# Altium PCB SciencePCB5.pcbdoc
Units mil, origin at the board's own origin, x right, y up, seen from the top; angles counter-clockwise.
Board outline 3937.01 x 3858.27 mil, 2 copper layers (Top Layer, Bottom Layer); 11 components, 33 nets, 387 pads, 40 vias.
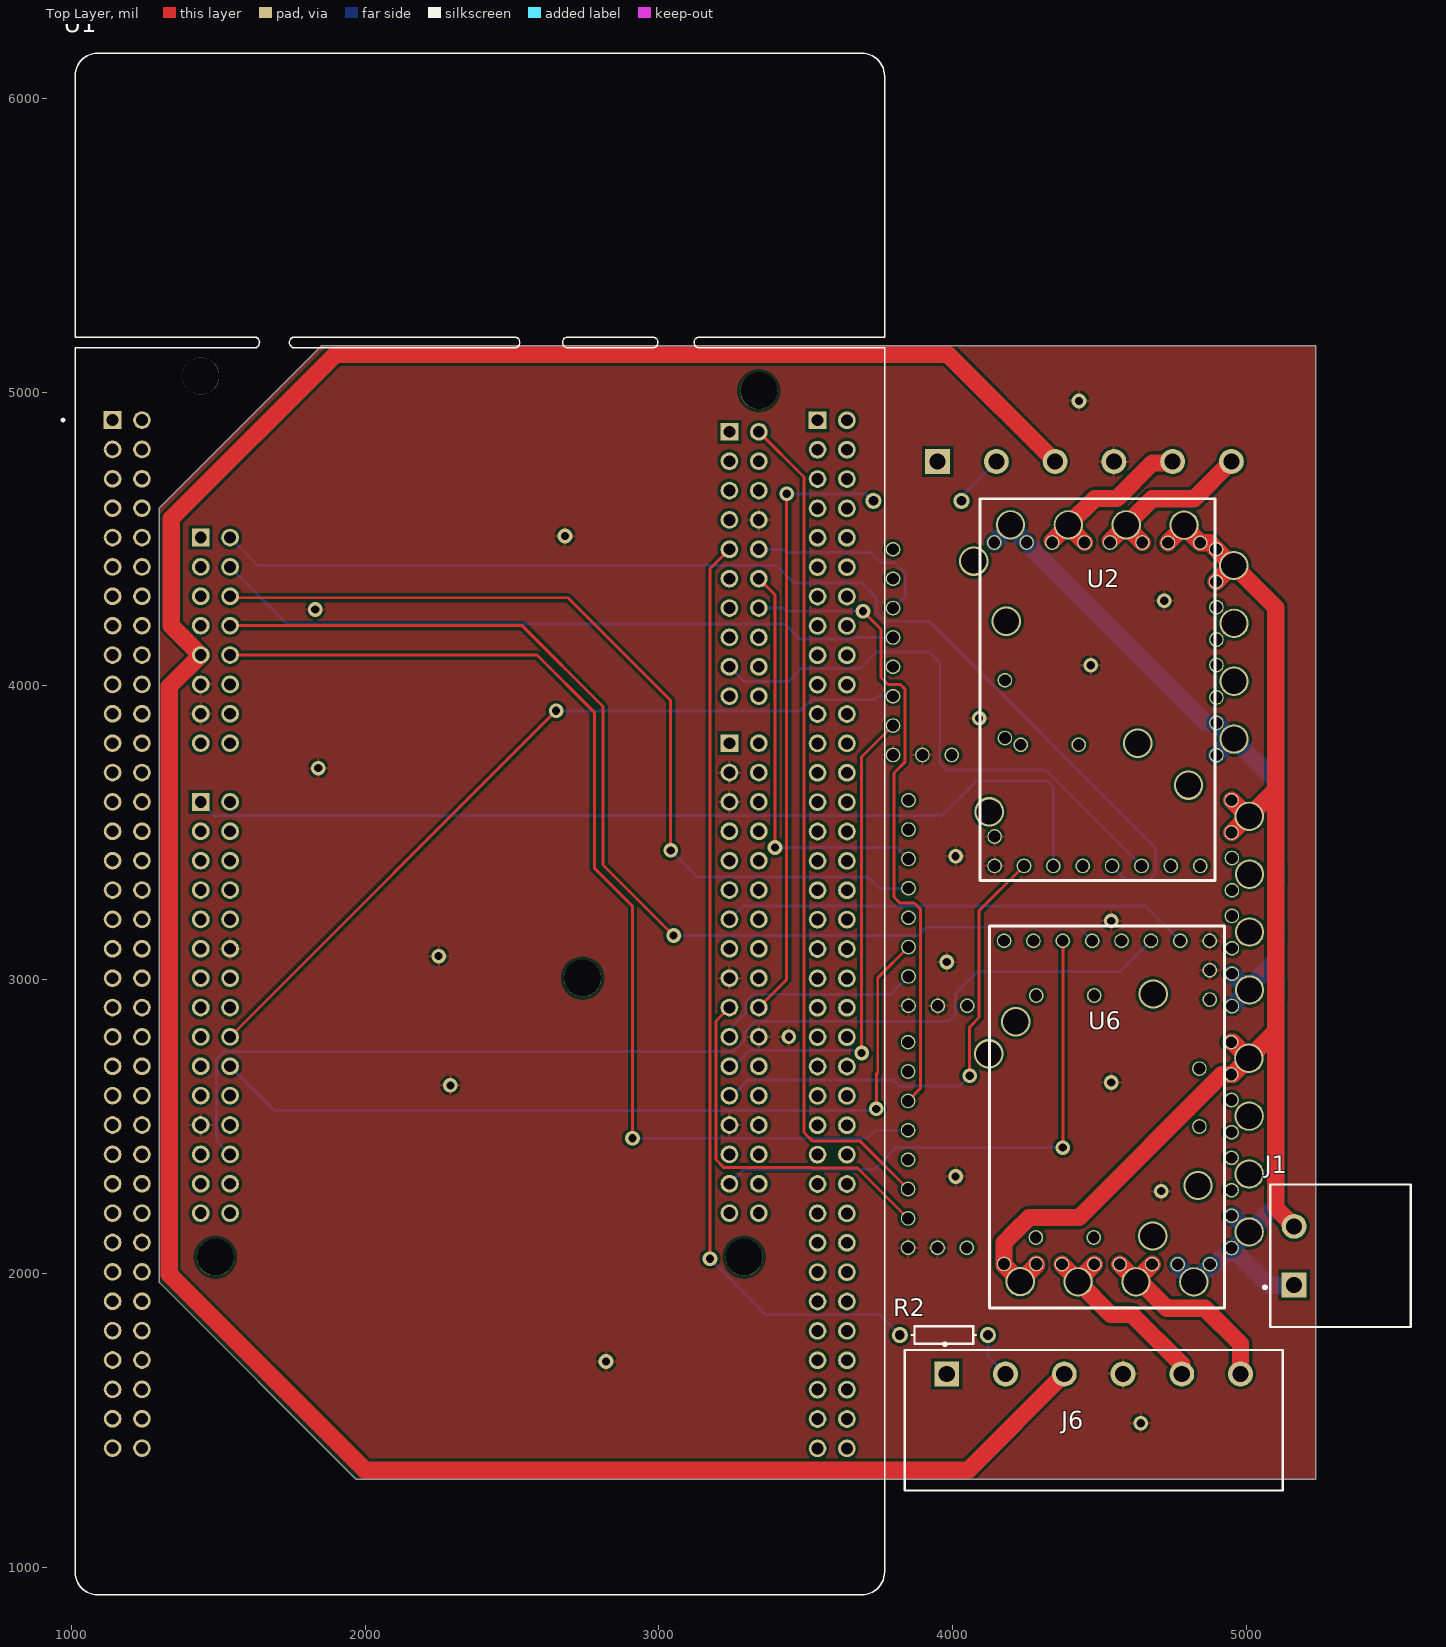
[diagram p0: Top Layer view]
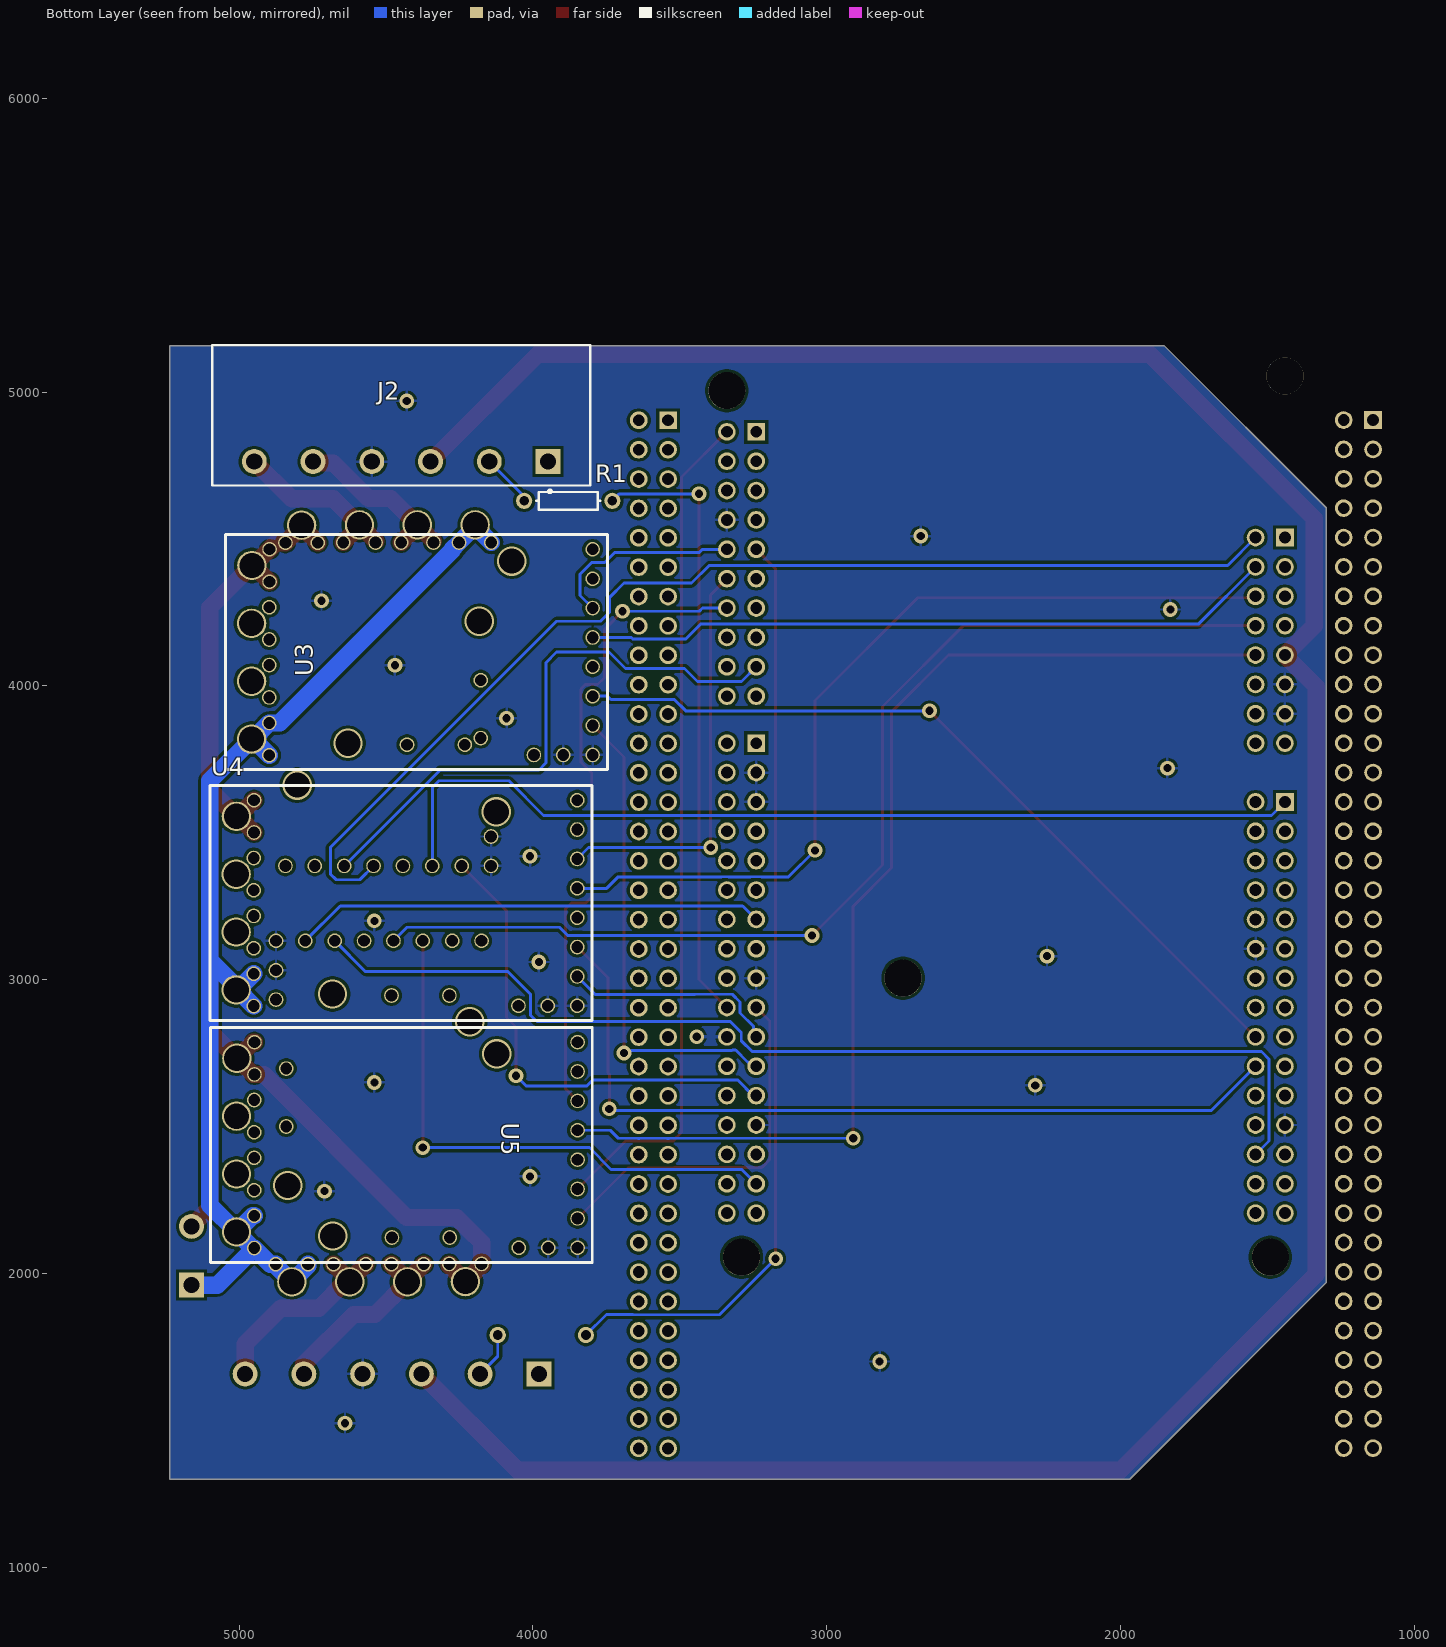
[diagram p1: Bottom Layer view, seen from below]
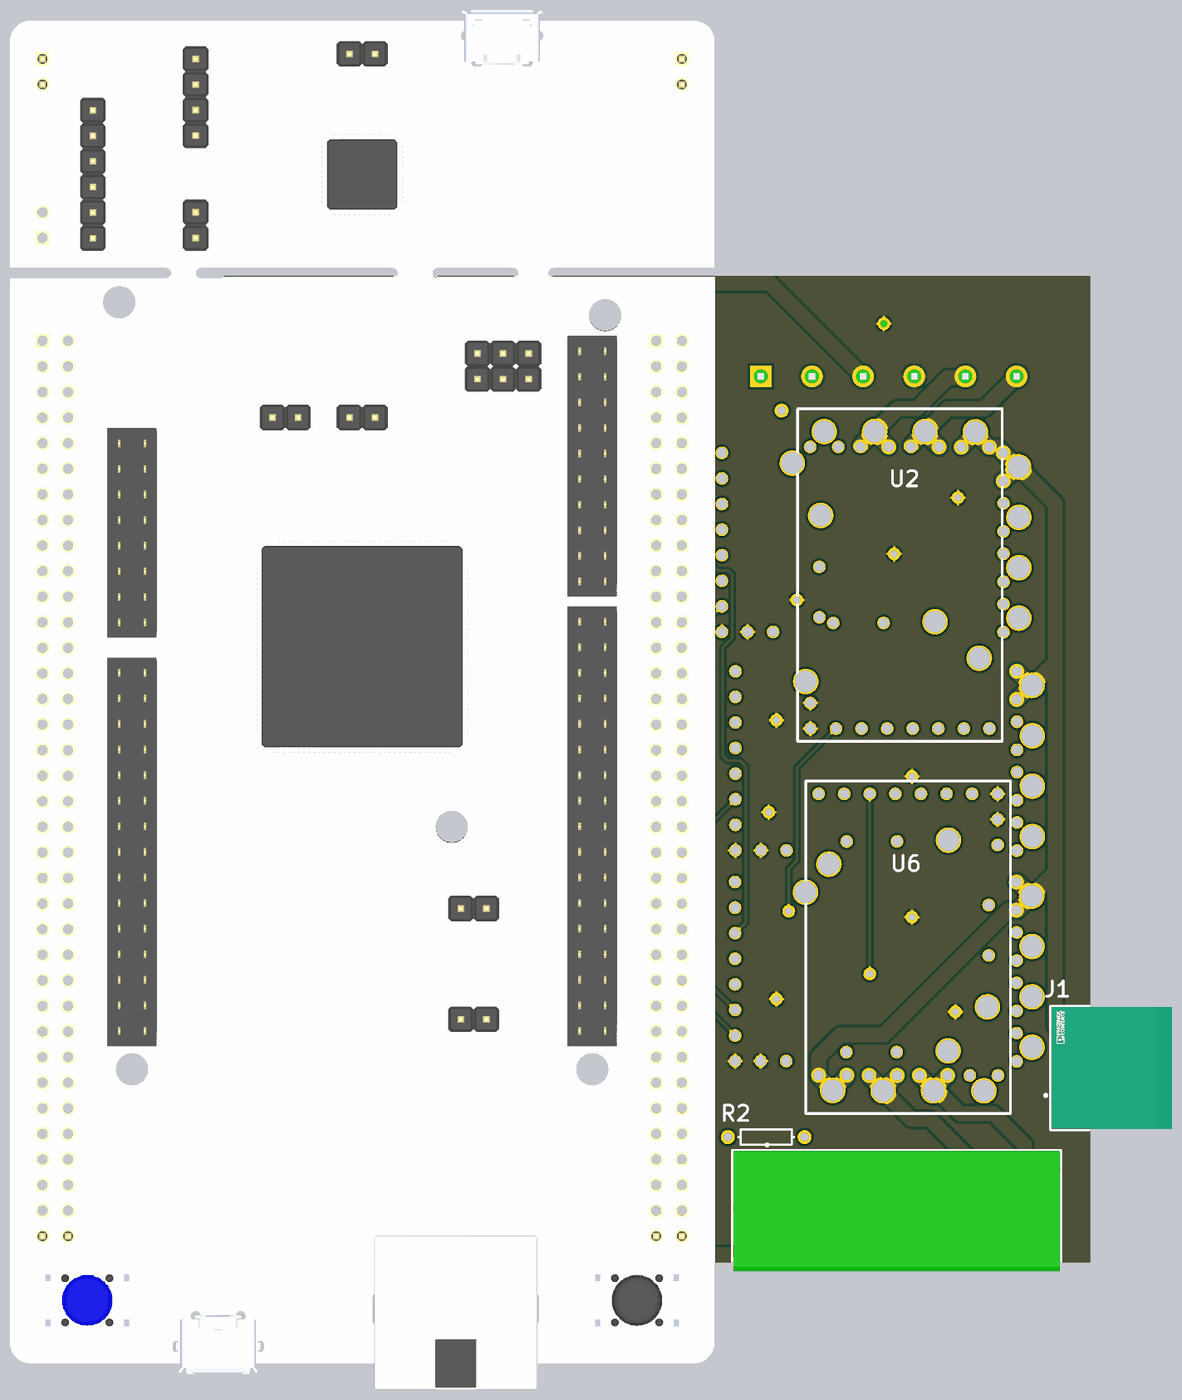
[diagram p2: 3D render of the assembled board from above, using the file's embedded part models]

## Layer stack, top to bottom
Top Solder: solder mask 0.4, Solder Resist, Dk 3.5
Top Layer: signal copper 1.4
Dielectric 1: dielectric 12.6, FR-4, Dk 4.8
Bottom Layer: signal copper 1.4
Bottom Solder: solder mask 0.4, Solder Resist, Dk 3.5

## Board outline
1968.5,1299.21 1299.21,1968.5 1299.21,4606.3 1850.39,5157.48 5236.22,5157.48 5236.22,1299.21

## Design rules (kind name [scope] priority, off if disabled: settings)
Clearance [InNetClass('All Nets')] p1: gap=10 ignorepadtopadclearanceinfootprint=FALSE except(0: Arc-Hole Track-Hole SMDPad-Hole THPad-Hole Via-Hole Fill-Hole Poly-Hole Region-Hole Text-Hole)
PolygonConnect [All] p1: connectstyle=Relief reliefconductorwidth=10 reliefentries=4 polygonreliefangle="90 Angle" airgapwidth=10
RoutingVias [All] p1: holewidth=28 width=50 viastyle="Through Hole" minholewidth=28 minwidth=50 maxholewidth=28 maxwidth=50
SolderMaskExpansion [All] p1: expansion=4 istentingtop=FALSE
Width Width_1 [InNetClass('logic')] p1: maxlimit=10 minlimit=10 preferedwidth=10
Width [InNetClass('power')] p2: maxlimit=59.06 minlimit=59.06 preferedwidth=59.06 minimp=50.000000 maximp=50.000000 favimp=50.000000
30 further rules are at their usual default settings.

## Classes and differential pairs
net class logic: NetJ2_2 NetJ6_2 NetR1_1 NetR2_1 NetU1_CN7_2 NetU1_CN7_10 NetU1_CN7_12 NetU1_CN7_14 NetU1_CN7_17 NetU1_CN8_2 NetU1_CN8_4 NetU1_CN8_6 NetU1_CN8_8 NetU1_CN8_10 NetU1_CN9_1 NetU1_CN9_18 NetU1_CN9_20 NetU1_CN9_26 NetU1_CN10_13 NetU1_CN10_19 NetU1_CN10_21 NetU1_CN10_23 NetU1_CN10_25 NetU1_CN10_31
net class power: +5 +24 GND_M NetJ2_5 NetJ2_6 NetJ6_5 NetJ6_6
component class STM32: U1
component class SCIENCE: J1 J2 J6 R1 R2 U2 U3 U4 U5 U6

## Components (designator, comment, footprint, x,y, rotation, side; value= is the part's Value field where it differs from the comment)
J1 "1757242" FP-1757242-MFG 5320,2060 r90 top
J2 "1757284" FP-1757284-MFG 4448.82,4921.26 r0 bottom
J6 "1757284" FP-1757284-MFG 4480,1500 r0 top
R1 "Res1" AXIAL-0.3 3880,4630 r0 bottom value=320
R2 "Res1" AXIAL-0.3 3970,1790 r0 top value=320
U1 "NUCLEO-F429ZI" MODULE_NUCLEO-F429ZI 2390,3529.8 r0 top
U2 "Pololu G2 High-Power Motor Driver 24v21" "Pololu G2 High-Power Motor Driver 24v21" 4892.82,4637.19 r180 top
U3 "Pololu G2 High-Power Motor Driver 24v21" "Pololu G2 High-Power Motor Driver 24v21" 5046.91,4514.86 r270 bottom
U4 "Pololu G2 High-Power Motor Driver 24v21" "Pololu G2 High-Power Motor Driver 24v21" 5099.63,3660.94 r270 bottom
U5 "Pololu G2 High-Power Motor Driver 24v21" "Pololu G2 High-Power Motor Driver 24v21" 5098.27,2837.17 r270 bottom
U6 "Pololu G2 High-Power Motor Driver 24v21" "Pololu G2 High-Power Motor Driver 24v21" 4125,1882 r0 top

## Footprints (in the part's own frame and the unit in brackets; to place one, negate y for a bottom-side part, rotate by r counter-clockwise, add the part's x,y. Pads: shape width x height; smd on the part's side, far side on the other; paste and mask are expansions set on the pad)
AXIAL-0.3 [mm] "Axial Device, Thru-Hole; 2 Leads; 0.3 in Pin Spacing"
  round 1.4 hole 0.85: 1(-3.81,0) 2(3.81,0)
  silkscreen extent -2.77,-0.76 2.77,0.76
FP-1757242-MFG [mm]
  rect 2.15x2.15 hole 1.4 paste-1000 mask+0: 1(-2.54,4)
  round 2.15 hole 1.4 paste-1000 mask+0: 2(2.54,4)
  silkscreen extent -6.15,-6.07 6.15,6.65, body extent -6.04,-6 6.04,6, height 8.75
FP-1757284-MFG [mm]
  rect 2.15x2.15 hole 1.4 paste-1000 mask+0: 1(-12.7,4)
  round 2.15 hole 1.4 paste-1000 mask+0: 2(-7.62,4) 3(-2.54,4) 4(2.54,4) 5(7.62,4) 6(12.7,4)
  silkscreen extent -16.34,-6.08 16.34,6.7, body extent -16.2,-6 16.2,6, height 8.61
MODULE_NUCLEO-F429ZI [mm]
  rect 1.53x1.53 / inner round 1.53 / far side rect 1.53x1.53 hole 1.02: CN7_1(21.59,33.914) CN8_1(-24.13,24.77) CN9_1(-24.13,1.91) CN10_1(21.59,6.99) CN11_1(-31.75,34.93) CN12_1(29.21,34.91)
  round 1.53 hole 1.02: CN7_2(24.13,33.914) CN7_3(21.59,31.374) CN7_4(24.13,31.374) CN7_5(21.59,28.834) CN7_6(24.13,28.834) CN7_7(21.59,26.294) CN7_8(24.13,26.294) CN7_9(21.59,23.754) CN7_10(24.13,23.754) CN7_11(21.59,21.214) CN7_12(24.13,21.214) CN7_13(21.59,18.674) CN7_14(24.13,18.674) CN7_15(21.59,16.134) CN7_16(24.13,16.134) CN7_17(21.59,13.594) CN7_18(24.13,13.594) CN7_19(21.59,11.054) CN7_20(24.13,11.054) CN8_2(-21.59,24.77) CN8_3(-24.13,22.23) CN8_4(-21.59,22.23) CN8_5(-24.13,19.69) CN8_6(-21.59,19.69) CN8_7(-24.13,17.15) CN8_8(-21.59,17.15) CN8_9(-24.13,14.61) CN8_10(-21.59,14.61) CN8_11(-24.13,12.07) CN8_12(-21.59,12.07) CN8_13(-24.13,9.53) CN8_14(-21.59,9.53) CN8_15(-24.13,6.99) CN8_16(-21.59,6.99) CN9_2(-21.59,1.91) CN9_3(-24.13,-0.63) CN9_4(-21.59,-0.63) CN9_5(-24.13,-3.17) CN9_6(-21.59,-3.17) CN9_7(-24.13,-5.71) CN9_8(-21.59,-5.71) CN9_9(-24.13,-8.25) CN9_10(-21.59,-8.25) CN9_11(-24.13,-10.79) CN9_12(-21.59,-10.79) CN9_13(-24.13,-13.33) CN9_14(-21.59,-13.33) CN9_15(-24.13,-15.87) CN9_16(-21.59,-15.87) CN9_17(-24.13,-18.41) CN9_18(-21.59,-18.41) CN9_19(-24.13,-20.95) CN9_20(-21.59,-20.95) CN9_21(-24.13,-23.49) CN9_22(-21.59,-23.49) CN9_23(-24.13,-26.03) CN9_24(-21.59,-26.03) CN9_25(-24.13,-28.57) CN9_26(-21.59,-28.57) CN9_27(-24.13,-31.11) CN9_28(-21.59,-31.11) CN9_29(-24.13,-33.65) CN9_30(-21.59,-33.65) CN10_2(24.13,6.99) CN10_3(21.59,4.45) CN10_4(24.13,4.45) CN10_5(21.59,1.91) CN10_6(24.13,1.91) CN10_7(21.59,-0.63) CN10_8(24.13,-0.63) CN10_9(21.59,-3.17) CN10_10(24.13,-3.17) CN10_11(21.59,-5.71) CN10_12(24.13,-5.71) CN10_13(21.59,-8.25) CN10_14(24.13,-8.25) CN10_15(21.59,-10.79) CN10_16(24.13,-10.79) CN10_17(21.59,-13.33) CN10_18(24.13,-13.33) CN10_19(21.59,-15.87) CN10_20(24.13,-15.87) CN10_21(21.59,-18.41) CN10_22(24.13,-18.41) CN10_23(21.59,-20.95) CN10_24(24.13,-20.95) CN10_25(21.59,-23.49) CN10_26(24.13,-23.49) CN10_27(21.59,-26.03) CN10_28(24.13,-26.03) CN10_29(21.59,-28.57) CN10_30(24.13,-28.57) CN10_31(21.59,-31.11) CN10_32(24.13,-31.11) CN10_33(21.59,-33.65) CN10_34(24.13,-33.65) CN11_2(-29.21,34.93) CN11_3(-31.75,32.39) CN11_4(-29.21,32.39) CN11_5(-31.75,29.85) CN11_6(-29.21,29.85) CN11_7(-31.75,27.31) CN11_8(-29.21,27.31) CN11_9(-31.75,24.77) CN11_10(-29.21,24.77) CN11_11(-31.75,22.23) CN11_12(-29.21,22.23) CN11_13(-31.75,19.69) CN11_14(-29.21,19.69) CN11_15(-31.75,17.15) CN11_16(-29.21,17.15) CN11_17(-31.75,14.61) CN11_18(-29.21,14.61) CN11_19(-31.75,12.07) CN11_20(-29.21,12.07) CN11_21(-31.75,9.53) CN11_22(-29.21,9.53) CN11_23(-31.75,6.99) CN11_24(-29.21,6.99) CN11_25(-31.75,4.45) CN11_26(-29.21,4.45) CN11_27(-31.75,1.91) CN11_28(-29.21,1.91) CN11_29(-31.75,-0.63) CN11_30(-29.21,-0.63) CN11_31(-31.75,-3.17) CN11_32(-29.21,-3.17) CN11_33(-31.75,-5.71) CN11_34(-29.21,-5.71) CN11_35(-31.75,-8.25) CN11_36(-29.21,-8.25) CN11_37(-31.75,-10.79) CN11_38(-29.21,-10.79) CN11_39(-31.75,-13.33) CN11_40(-29.21,-13.33) CN11_41(-31.75,-15.87) CN11_42(-29.21,-15.87) CN11_43(-31.75,-18.41) CN11_44(-29.21,-18.41) CN11_45(-31.75,-20.95) CN11_46(-29.21,-20.95) CN11_47(-31.75,-23.49) CN11_48(-29.21,-23.49) CN11_49(-31.75,-26.03) CN11_50(-29.21,-26.03) CN11_51(-31.75,-28.57) CN11_52(-29.21,-28.57) CN11_53(-31.75,-31.11) CN11_54(-29.21,-31.11) CN11_55(-31.75,-33.65) CN11_56(-29.21,-33.65) CN11_57(-31.75,-36.19) CN11_58(-29.21,-36.19) CN11_59(-31.75,-38.73) CN11_60(-29.21,-38.73) CN11_61(-31.75,-41.27) CN11_62(-29.21,-41.27) CN11_63(-31.75,-43.81) CN11_64(-29.21,-43.81) CN11_65(-31.75,-46.35) CN11_66(-29.21,-46.35) CN11_67(-31.75,-48.89) CN11_68(-29.21,-48.89) CN11_69(-31.75,-51.43) CN11_70(-29.21,-51.43) CN11_71(-31.75,-53.97) CN11_72(-29.21,-53.97) CN12_2(31.75,34.91) CN12_3(29.21,32.37) CN12_4(31.75,32.37) CN12_5(29.21,29.83) CN12_6(31.75,29.83) CN12_7(29.21,27.29) CN12_8(31.75,27.29) CN12_9(29.21,24.75) CN12_10(31.75,24.75) CN12_11(29.21,22.21) CN12_12(31.75,22.21) CN12_13(29.21,19.67) CN12_14(31.75,19.67) CN12_15(29.21,17.13) CN12_16(31.75,17.13) CN12_17(29.21,14.59) CN12_18(31.75,14.59) CN12_19(29.21,12.05) CN12_20(31.75,12.05) CN12_21(29.21,9.51) CN12_22(31.75,9.51) CN12_23(29.21,6.97) CN12_24(31.75,6.97) CN12_25(29.21,4.43) CN12_26(31.75,4.43) CN12_27(29.21,1.89) CN12_28(31.75,1.89) CN12_29(29.21,-0.65) CN12_30(31.75,-0.65) CN12_31(29.21,-3.19) CN12_32(31.75,-3.19) CN12_33(29.21,-5.73) CN12_34(31.75,-5.73) CN12_35(29.21,-8.27) CN12_36(31.75,-8.27) CN12_37(29.21,-10.81) CN12_38(31.75,-10.81) CN12_39(29.21,-13.35) CN12_40(31.75,-13.35) CN12_41(29.21,-15.89) CN12_42(31.75,-15.89) CN12_43(29.21,-18.43) CN12_44(31.75,-18.43) CN12_45(29.21,-20.97) CN12_46(31.75,-20.97) CN12_47(29.21,-23.51) CN12_48(31.75,-23.51) CN12_49(29.21,-26.05) CN12_50(31.75,-26.05) CN12_51(29.21,-28.59) CN12_52(31.75,-28.59) CN12_53(29.21,-31.13) CN12_54(31.75,-31.13) CN12_55(29.21,-33.67) CN12_56(31.75,-33.67) CN12_57(29.21,-36.21) CN12_58(31.75,-36.21) CN12_59(29.21,-38.75) CN12_60(31.75,-38.75) CN12_61(29.21,-41.29) CN12_62(31.75,-41.29) CN12_63(29.21,-43.83) CN12_64(31.75,-43.83) CN12_65(29.21,-46.37) CN12_66(31.75,-46.37) CN12_67(29.21,-48.91) CN12_68(31.75,-48.91) CN12_69(29.21,-51.45) CN12_70(31.75,-51.45) CN12_71(29.21,-53.99) CN12_72(31.75,-53.99)
  round 3.2 hole 3.2 unplated: ""(-24.13,38.74) ""(-22.86,-37.46) ""(8.89,-13.33) ""(22.86,-37.46) ""(24.13,37.47)
  silkscreen extent -36.14,-66.67 35,66.67, body extent -35,-69.27 35,67.72, height 12.28
"Pololu G2 High-Power Motor Driver 24v21" [mil]
  round 50 hole 40: 1(50,1250) 2(150,1250) 3(250,1250) 4(350,1250) 5(450,1250) 6(550,1250) 7(650,1250) 8(750,1150) 8(750,1250) 9(750,1050) 10(715,815) 11(715,618) 12(641,149) 12(751,149) 13(444,149) 13(554,149) 14(247,149) 14(357,149) 15(50,150) 15(160,150)
  round 100 hole 86: 12(696,89) 13(499,89) 14(302,89) 15(105,90)
  silkscreen extent 0,0 800,1300

## Part data
J1: library part CMP-09399-000010-1, "TERM BLOCK HDR 2POS 90DEG 5.08MM", Color=Grey, Current=15A, Current Rating=12A, Flammability Rating="UL94 V-0", Housing Color=Green, Package Quantity=50, Voltage=300V, Voltage Rating=250V, Voltage Rating (DC)=320V, Approvals=UL, Connector Type=Plug, Contact Material=Tin, Contact Plating=Tin, Depth=12mm, Gender=Male, Height=12.08mm, Housing Material=PBT, Lead Free="Lead Free", Length=12.16mm, Max Current Rating=12A, Mount="Through Hole", Number of Contacts=2, Number of Levels=1, Number of Poles=2, Number of Positions=2, Number of Positions Per Level=2, Number of Rows=1, Orientation="Right Angle", Packaging=Bulk, Pitch=5.08mm, REACH SVHC="No SVHC", RoHS Compliant=Yes, Series=MSTBA, Termination=Solder, Weight=5.396916oz, Width=12.1mm
J2 J6: library part CMP-09399-000007-1, "TERM BLOCK HDR 6POS 90DEG 5.08MM", Color=Grey, Current=15A, Current Rating=12A, Flammability Rating="UL94 V-0", Housing Color=Green, Package Quantity=50, Voltage=300V, Voltage Rating=250V, Voltage Rating (DC)=320V, Approvals=UL, Connector Type=Plug, Contact Material=Tin, Contact Plating=Tin, Depth=12mm, Gender=Male, Height=12.1mm, Housing Material=Polybutylene, Lead Free="Lead Free", Length=32.48mm, Max Current Rating=12A, Mount="Through Hole", Number of Contacts=6, Number of Levels=1, Number of Poles=6, Number of Positions=6, Number of Positions Per Level=6, Number of Rows=1, Orientation="Right Angle", Packaging=Bulk, Pitch=5.08mm, REACH SVHC="No SVHC", RoHS Compliant=Yes, Series=MSTBA, Termination=Solder, Weight=5.396916oz, Width=32.4mm
R1 R2: "Resistor", LatestRevisionDate=17-Jul-2002, LatestRevisionNote="Re-released for DXP Platform.", PackageDescription="Axial Device, Thru-Hole; 2 Leads; 0.3 in Pin Spacing", PackageReference=AXIAL-0.3, Published=8-Jun-2000, Publisher="Altium Limited"
U1: "STM32F429ZI, mbed-Enabled Development Nucleo-144 STM32F4 ARMÂ® CortexÂ®-M4 MCU 32-Bit Embedded Evaluation Board", Package=None, Availability="In Stock", Check_prices=https://www.snapeda.com/parts/NUCLEO-F429ZI/STMicroelectronics/view-part/?ref=eda, MF=STMicroelectronics, MP=NUCLEO-F429ZI, Price=None, Purchase-URL=https://pricing.snapeda.com/search/part/NUCLEO-F429ZI/?ref=eda, SnapEDA_Link=https://www.snapeda.com/parts/NUCLEO-F429ZI/STMicroelectronics/view-part/?ref=snap

## Via types
v1: diameter 50, hole 28, Top Layer to Bottom Layer, 30 vias
v2: diameter 100, hole 86, Top Layer to Bottom Layer, 10 vias

## Nets (pads, with @x,y where several pads share a name; then routed paths per layer and width w, separated by ;. In a path a pad name is that pad's centre, name@x,y a point inside that pad or via, vN(x,y) a via of type N, cw(c..) or ccw(c..) an arc to the next point about the centre after c; other vN are vias at no path point)
+3.3: U1.CN8_7
+5: J2.3 J6.3 U1.CN8_9 | length 9508.5
  Top Layer w59.06: J2.3 3984.6,5128 1898,5128 1340,4570 1340,4205 U1.CN8_9 1333,3998 1333,1997 2000,1330 4052.52,1330 J6.3
+24: J1.2 U2.15 U3.15 U4.15 U5.15 U6.15 | length 4552.5
  Top Layer w59.06: U6.15@4285,2032 4285,2027 4230,1972 4175,2027 4175,2032 4175,2105 4218.74,2148.74 4218.74,2148.89 4259.85,2190 4302.38,2190 4387.46,2190 4430,2190 4917.17,2677.17 4948.27,2677.17 4953.27,2677.17 U5.15@5008.27,2732.17 ; U2.15@4732.82,4487.19 U2.15@4787.82,4542.19 ; U2.15@4787.82,4547.19 U2.15@4787.82,4542.19 ; U3.15@4896.91,4354.86 U3.15@4951.91,4409.86 ; U5.15@4948.27,2787.17 4953.27,2787.17 U5.15@5008.27,2732.17 ; U4.15@4949.63,3500.94 U4.15@5004.63,3555.94 ; U4.15@4949.63,3610.94 U4.15@5004.63,3555.94 ; J1.2 5100,2222.52 5100,2823.9 ; U2.15@4787.82,4542.19 4842.82,4487.19 4874.58,4487.19 4896.91,4464.86 U3.15@4951.91,4409.86 ; U3.15@4951.91,4409.86 4956.91,4409.86 5100,4266.77 5100,3646.31 ; U4.15@5004.63,3555.94 5009.63,3555.94 5100,3646.31 ; U5.15@5008.27,2732.17 5100,2823.9 ; 5100,2823.9 5100,2927.7 5100.16,2927.85 5100.16,3002.02 5100,3002.18 5100,3124.7 5100.16,3124.85 5100.16,3199.02 5100,3199.18 5100,3321.7 5100.16,3321.85 5100.16,3396.02 5100,3396.18 5100,3646.31
GND: J2.4 J6.4 U1.CN7_8 U1.CN8_11 U1.CN8_13 U1.CN9_12 U1.CN9_23 U1.CN10_3 U1.CN10_5 U1.CN10_17 U1.CN10_22 U1.CN10_27 U2.8 U3.8 U4.8 U5.8 U6.8
  other v1: 4640,1490 2820,1700 4710,2280 4010,2330 2290,2640 4540,2650 3442.42,2805.87 3980,3060 2250,3080 4540,3200 4010,3420 1840,3720 4090,3890 4470,4070 1830,4260 4720,4290 2680,4510 4430,4970
GND_M: J1.1 U2.12 U3.12 U4.12 U5.12 U6.12 | length 3989.4
  Bottom Layer w59.06: U2.12@4141.82,4488.19 U2.12@4196.82,4543.19 ; U2.12@4196.82,4548.19 U2.12@4196.82,4543.19 ; U6.12@4766,2031 4766,2026 4821,1971 4876,2026 4876,2031 4894.1,2031 U5.12@4949.27,2086.17 ; U3.12@4897.91,3763.86 U3.12@4952.91,3818.86 ; U5.12@4949.27,2196.17 4954.27,2196.17 U5.12@5009.27,2141.17 ; U4.12@4950.63,2909.94 U4.12@5005.63,2964.94 ; U4.12@4950.63,3019.94 U4.12@5005.63,2964.94 ; J1.1 5075.43,1960 U5.12@4949.27,2086.17 ; U2.12@4196.82,4543.19 4251.82,4488.19 4274.29,4465.72 4274.29,4461.46 4861.89,3873.86 4897.91,3873.86 U3.12@4952.91,3818.86 ; U5.12@4949.27,2086.17 4954.27,2086.17 U5.12@5009.27,2141.17 ; U3.12@4952.91,3818.86 4957.91,3818.86 5100.16,3676.61 5100.16,3065.54 ; U4.12@5005.63,2964.94 5010.63,2964.94 5010.63,2976.02 5100.16,3065.54 ; U5.12@5009.27,2141.17 5100.16,2232.06 5100.16,3065.54
NetJ2_2: J2.2 R1.2 | length 183
  Bottom Layer w10: R1.2 4030,4644.96 J2.2
NetJ2_5: J2.5 U2.13 | length 609.9
  Top Layer w10: U2.13@4338.82,4488.19 U2.13@4338.82,4493.19 ; U2.13@4393.82,4543.19 U2.13@4393.82,4548.19
  Top Layer w59.06: U2.13@4338.82,4493.19 4393.82,4548.19 4483.35,4637.72 4558.98,4637.72 4680.14,4758.88 4743.92,4758.88 J2.5 ; U2.13@4393.82,4543.19 U2.13@4448.82,4488.19
NetJ2_6: J2.6 U2.14 | length 612.9
  Top Layer w10: U2.14@4535.82,4488.19 U2.14@4535.82,4493.19 ; U2.14@4590.82,4543.19 U2.14@4590.82,4548.19
  Top Layer w59.06: U2.14@4535.82,4493.19 4590.82,4548.19 4679.35,4636.72 4821.76,4636.72 J2.6 ; U2.14@4590.82,4543.19 U2.14@4645.82,4488.19
NetJ6_2: J6.2 R2.2 | length 157.4
  Bottom Layer w10: R2.2 4120,1717.48 J6.2
NetJ6_5: J6.5 U6.14 | length 662.5
  Top Layer w10: U6.14@4427,1971 U6.14@4427,1976
  Top Layer w59.06: U6.14@4372,2031 4427,1976 U6.14@4482,2031 ; U6.14@4427,1971 4538,1860 4610,1860 4780,1690 J6.5
NetJ6_6: J6.6 U6.13 | length 706.5
  Top Layer w10: U6.13@4624,1971 U6.13@4624,1976
  Top Layer w59.06: U6.13@4569,2031 4624,1976 U6.13@4679,2031 ; U6.13@4624,1971 4639,1971 4728.53,1881.47 4858.53,1881.47 4980,1760 J6.6
NetR1_1: R1.1 U1.CN10_20 | length 2093.3
  Top Layer w10: U1.CN10_20 3435,3000 v1(3435,4654)
  Bottom Layer w10: v1(3435,4654) 3706,4654 R1.1
NetR2_1: R2.1 U1.CN7_9 | length 3196.8
  Top Layer w10: v1(3174,2050) 3174,4399 U1.CN7_9
  Bottom Layer w10: v1(3174,2050) 3364.91,1859.09 3658.69,1859.09 3659.59,1860 3750,1860 R2.1
NetU1_CN7_2: U1.CN7_2 U5.6 | length 2882.9
  Top Layer w10: U1.CN7_2 3494,4711 3494,2480 3524,2450 3685.43,2450 U5.6
NetU1_CN7_10: U1.CN7_10 U3.3 | length 668.2
  Bottom Layer w10: U1.CN7_10 3423,4465 3434,4454 3722,4454 3756,4420 3800,4420 3840,4380 3840,4307.95 U3.3
NetU1_CN7_12: U1.CN7_12 U4.3 | length 1408.6
  Top Layer w10: U1.CN7_12 3395,4310 v1(3395,3450)
  Bottom Layer w10: v1(3395,3450) 3810.57,3450 U4.3
NetU1_CN7_14: U1.CN7_14 U5.3 | length 2208.4
  Top Layer w10: v1(3695,4254) 3756,4193 3756,4029 3780,4005 3822,4005 3837,3990 3837,3740 3800,3703 3800,3281 3820,3261 3869,3261 3890,3240 3890,2628.9 U5.3
  Bottom Layer w10: U1.CN7_14 3423,4265 3434,4254 v1(3695,4254)
NetU1_CN7_17: U1.CN7_17 U2.3 | length 1966.2
  Bottom Layer w10: U1.CN7_17 3290,4015 3440,4015 3484,4059 3685,4059 3741,4115 3920,4115 3956,4079 3956,3738 3980,3714 4316.01,3714 U2.3
NetU1_CN8_2: U1.CN8_2 U2.4 | length 3881.9
  Bottom Layer w10: U1.CN8_2 1634.88,4410.12 3221.31,4410.12 3258.69,4410.12 3259.4,4409.4 3260,4410 3321.19,4410 3321.31,4410.12 3358.69,4410.12 3358.81,4410 3400,4410 3460,4350 3690,4350 3740,4300 3740,4250 3770,4220 3920,4220 4690,3450 4690,3360 4670,3340 4590.01,3340 U2.4
NetU1_CN8_4: U1.CN8_4 U3.4 | length 2361.3
  Bottom Layer w10: U1.CN8_4 1735,4210 3236.74,4210 cw(c3240,4165) 3240,4210.12 cw(c3240,4165) 3243.26,4210 3260.16,4210 3321.19,4210 3321.31,4210.12 3358.69,4210.12 3358.81,4210 3430,4210 3480.91,4159.09 3658.69,4159.09 3664.45,4164.86 U3.4
NetU1_CN8_6: U1.CN8_6 U4.4 | length 3020.3
  Top Layer w10: U1.CN8_6 1545,4300 2690,4300 3040,3950 v1(3040,3440)
  Bottom Layer w10: v1(3040,3440) 3130,3350 3221.19,3350 3221.31,3350.12 3258.69,3350.12 3258.81,3350 3334.6,3350 3334.72,3350.12 3358.69,3350.12 3358.81,3350 3710,3350 3749.06,3310.94 U4.4
NetU1_CN8_8: U1.CN8_8 U6.4 | length 3720
  Top Layer w10: U1.CN8_8 2535,4205 2810,3930 2810,3390 v1(3050,3150)
  Bottom Layer w10: v1(3050,3150) 3236.74,3150 cw(c3240,3105) 3240,3150.12 cw(c3240,3105) 3243.26,3150 3336.74,3150 cw(c3340,3105) 3340,3150.12 cw(c3340,3105) 3343.26,3150 3832.12,3150 3833.06,3150.94 3866.2,3150.94 3867.14,3150 3881.68,3150 3910,3178.32 4428.68,3178.32 U6.4
NetU1_CN8_10: U1.CN8_10 U5.4 | length 3774.4
  Top Layer w10: U1.CN8_10 2585,4105 2780,3910 2780,3380 2910,3250 v1(2910,2460)
  Bottom Layer w10: v1(2910,2460) 3236.74,2460 ccw(c3240,2505) 3243.26,2460 3336.74,2460 ccw(c3340,2505) 3343.26,2460 3531,2460 ccw(c3540,2504.21) 3549,2460 3631,2460 ccw(c3640,2504.21) 3649,2460 3710,2460 3737.17,2487.17 U5.4
NetU1_CN9_1: U1.CN9_1 U2.6 | length 3247.2
  Bottom Layer w10: U1.CN9_1 1486,3559 3964,3559 4082,3677 4320,3677 4342.82,3654.18 U2.6
NetU1_CN9_18: U1.CN9_18 U3.6 | length 2737.3
  Top Layer w10: U1.CN9_18 v1(2650,3915)
  Bottom Layer w10: v1(2650,3915) 3480,3915 3519,3954 3735,3954 3745.86,3964.86 U3.6
NetU1_CN9_20: U1.CN9_20 U4.6 | length 2860.6
  Top Layer w10: v1(3740,2560) 3740,2678.13 3744.96,2683.08 3744.96,3006.27 U4.6
  Bottom Layer w10: U1.CN9_20 1690,2555 3735,2555 v1(3740,2560)
NetU1_CN9_26: U1.CN9_26 U6.6 | length 3748.7
  Bottom Layer w10: U1.CN9_26 1494,2451 1494,2729 1520,2755 3253.81,2755 3291,2792.19 3291,2819.81 3328.19,2857 3986,2857 4009,2880 4009,2951 4085,3027 4570,3027 U6.6
NetU1_CN10_13: U1.CN10_13 U6.7 | length 1603.3
  Bottom Layer w10: U1.CN10_13 3286,3251 4656,3251 U6.7
NetU1_CN10_19: U1.CN10_19 U5.7 | length 1274.1
  Top Layer w10: U1.CN10_19 3194,2859 3194,2387.19 3221.31,2359.88 3349.88,2359.88 3350,2360 3520,2360 3520.91,2359.09 3676.34,2359.09 U5.7
NetU1_CN10_21: U1.CN10_21 U4.7 | length 732.4
  Bottom Layer w10: U1.CN10_21 3248.81,2813.81 3248.81,2840 3294.88,2886.08 3294.88,2923.69 3321.31,2950.12 3448.69,2950.12 3448.81,2950 3788.69,2950 U4.7
NetU1_CN10_23: U1.CN10_23 U3.7 | length 1648.7
  Top Layer w10: v1(3690,2750) 3690,3757.95 U3.7
  Bottom Layer w10: U1.CN10_23@3248.92,2713.92 U1.CN10_23 3253.59,2705 3268,2719.4 3269.4,2719.4 3310,2760 3321.19,2760 3322.1,2759.09 3664.14,2759.09 3665.58,2757.65 3682.35,2757.65 v1(3690,2750)
NetU1_CN10_25: U1.CN10_25 U2.7 | length 1654.3
  Top Layer w10: v1(4058,2673) 4058,2839 4090,2871 4090,3234.37 U2.7
  Bottom Layer w10: U1.CN10_25 3249.85,2605 3303.85,2659 3796,2659 3817,2638 4023,2638 v1(4058,2673)
NetU1_CN10_31: U1.CN10_31 U6.3 | length 1889.9
  Top Layer w10: v1(4375,2428) U6.3
  Bottom Layer w10: U1.CN10_31 3289,2354 3734,2354 3808,2428 v1(4375,2428)
pads on no net: J2.1 J6.1 U1. U1.CN7_1 U1.CN7_3 U1.CN7_4 U1.CN7_5 U1.CN7_6 U1.CN7_7 U1.CN7_11 U1.CN7_13 U1.CN7_15 U1.CN7_16 U1.CN7_18 U1.CN7_19 U1.CN7_20 U1.CN8_1 U1.CN8_3 U1.CN8_5 U1.CN8_12 U1.CN8_14 U1.CN8_15 U1.CN8_16 U1.CN9_2 U1.CN9_3 U1.CN9_4 U1.CN9_5 U1.CN9_6 U1.CN9_7 U1.CN9_8 U1.CN9_9 U1.CN9_10 U1.CN9_11 U1.CN9_13 U1.CN9_14 U1.CN9_15 U1.CN9_16 U1.CN9_17 U1.CN9_19 U1.CN9_21 U1.CN9_22 U1.CN9_24 U1.CN9_25 U1.CN9_27 U1.CN9_28 U1.CN9_29 U1.CN9_30 U1.CN10_1 U1.CN10_2 U1.CN10_4 U1.CN10_6 U1.CN10_7 U1.CN10_8 U1.CN10_9 U1.CN10_10 U1.CN10_11 U1.CN10_12 U1.CN10_14 U1.CN10_15 U1.CN10_16 U1.CN10_18 U1.CN10_24 U1.CN10_26 U1.CN10_28 U1.CN10_29 U1.CN10_30 U1.CN10_32 U1.CN10_33 U1.CN10_34 U1.CN11_1 U1.CN11_2 U1.CN11_3 U1.CN11_4 U1.CN11_5 U1.CN11_6 U1.CN11_7 U1.CN11_8 U1.CN11_9 U1.CN11_10 U1.CN11_11 U1.CN11_12 U1.CN11_13 U1.CN11_14 U1.CN11_15 U1.CN11_16 U1.CN11_17 U1.CN11_18 U1.CN11_19 U1.CN11_20 U1.CN11_21 U1.CN11_22 U1.CN11_23 U1.CN11_24 U1.CN11_25 U1.CN11_26 U1.CN11_27 U1.CN11_28 U1.CN11_29 U1.CN11_30 U1.CN11_31 U1.CN11_32 U1.CN11_33 U1.CN11_34 U1.CN11_35 U1.CN11_36 U1.CN11_37 U1.CN11_38 U1.CN11_39 U1.CN11_40 U1.CN11_41 U1.CN11_42 U1.CN11_43 U1.CN11_44 U1.CN11_45 U1.CN11_46 U1.CN11_47 U1.CN11_48 U1.CN11_49 U1.CN11_50 U1.CN11_51 U1.CN11_52 U1.CN11_53 U1.CN11_54 U1.CN11_55 U1.CN11_56 U1.CN11_57 U1.CN11_58 U1.CN11_59 U1.CN11_60 U1.CN11_61 U1.CN11_62 U1.CN11_63 U1.CN11_64 U1.CN11_65 U1.CN11_66 U1.CN11_67 U1.CN11_68 U1.CN11_69 U1.CN11_70 U1.CN11_71 U1.CN11_72 U1.CN12_1 U1.CN12_2 U1.CN12_3 U1.CN12_4 U1.CN12_5 U1.CN12_6 U1.CN12_7 U1.CN12_8 U1.CN12_9 U1.CN12_10 U1.CN12_11 U1.CN12_12 U1.CN12_13 U1.CN12_14 U1.CN12_15 U1.CN12_16 U1.CN12_17 U1.CN12_18 U1.CN12_19 U1.CN12_20 U1.CN12_21 U1.CN12_22 U1.CN12_23 U1.CN12_24 U1.CN12_25 U1.CN12_26 U1.CN12_27 U1.CN12_28 U1.CN12_29 U1.CN12_30 U1.CN12_31 U1.CN12_32 U1.CN12_33 U1.CN12_34 U1.CN12_35 U1.CN12_36 U1.CN12_37 U1.CN12_38 U1.CN12_39 U1.CN12_40 U1.CN12_41 U1.CN12_42 U1.CN12_43 U1.CN12_44 U1.CN12_45 U1.CN12_46 U1.CN12_47 U1.CN12_48 U1.CN12_49 U1.CN12_50 U1.CN12_51 U1.CN12_52 U1.CN12_53 U1.CN12_54 U1.CN12_55 U1.CN12_56 U1.CN12_57 U1.CN12_58 U1.CN12_59 U1.CN12_60 U1.CN12_61 U1.CN12_62 U1.CN12_63 U1.CN12_64 U1.CN12_65 U1.CN12_66 U1.CN12_67 U1.CN12_68 U1.CN12_69 U1.CN12_70 U1.CN12_71 U1.CN12_72 U2.1 U2.2 U2.5 U2.9 U2.10 U2.11 U3.1 U3.2 U3.5 U3.9 U3.10 U3.11 U3.13 U3.14 U4.1 U4.2 U4.5 U4.9 U4.10 U4.11 U4.13 U4.14 U5.1 U5.2 U5.5 U5.9 U5.10 U5.11 U5.13 U5.14 U6.1 U6.2 U6.5 U6.9 U6.10 U6.11
copper on no net:
  other v2: 4681.27,2127.17 4835,2299 4123.27,2747.17 4215,2857 4682.63,2950.94 4124.63,3570.94 4802.82,3662.19 4629.91,3804.86 4182.82,4220.19 4071.91,4424.86

## Polygon pours and split planes (outlines as drawn)
GND on Bottom Layer "GND_L02_P003" (solid, pour order 3): 1968.5,1299.21 1299.21,1968.5 1299.21,4606.3 1850.39,5157.48 5236.22,5157.48 5236.22,1299.21
GND on Top Layer "GND_L01_P002" (solid, pour order 2): 1968.5,1299.21 1299.21,1968.5 1299.21,4606.3 1850.39,5157.48 5236.22,5157.48 5236.22,1299.21

## Silkscreen, mask and mechanical layers (free items; w line width, h text height)
Mechanical 15:
  the board outline again, w10

## Dimensions
5236.22,5157.48 to 5236.22,1299.21 on Mechanical 15
1299.21,1968.5 to 5236.22,5157.48 on Mechanical 15